# Altium PCB PCB_esp32_2026-10-11.pcbdoc
Units mil, origin at the board's own origin, x right, y up, seen from the top; angles counter-clockwise.
Board outline 4238.34 x 4241.91 mil, 2 copper layers (Top Layer, Bottom Layer); 60 components, 78 nets, 270 pads, 168 vias.
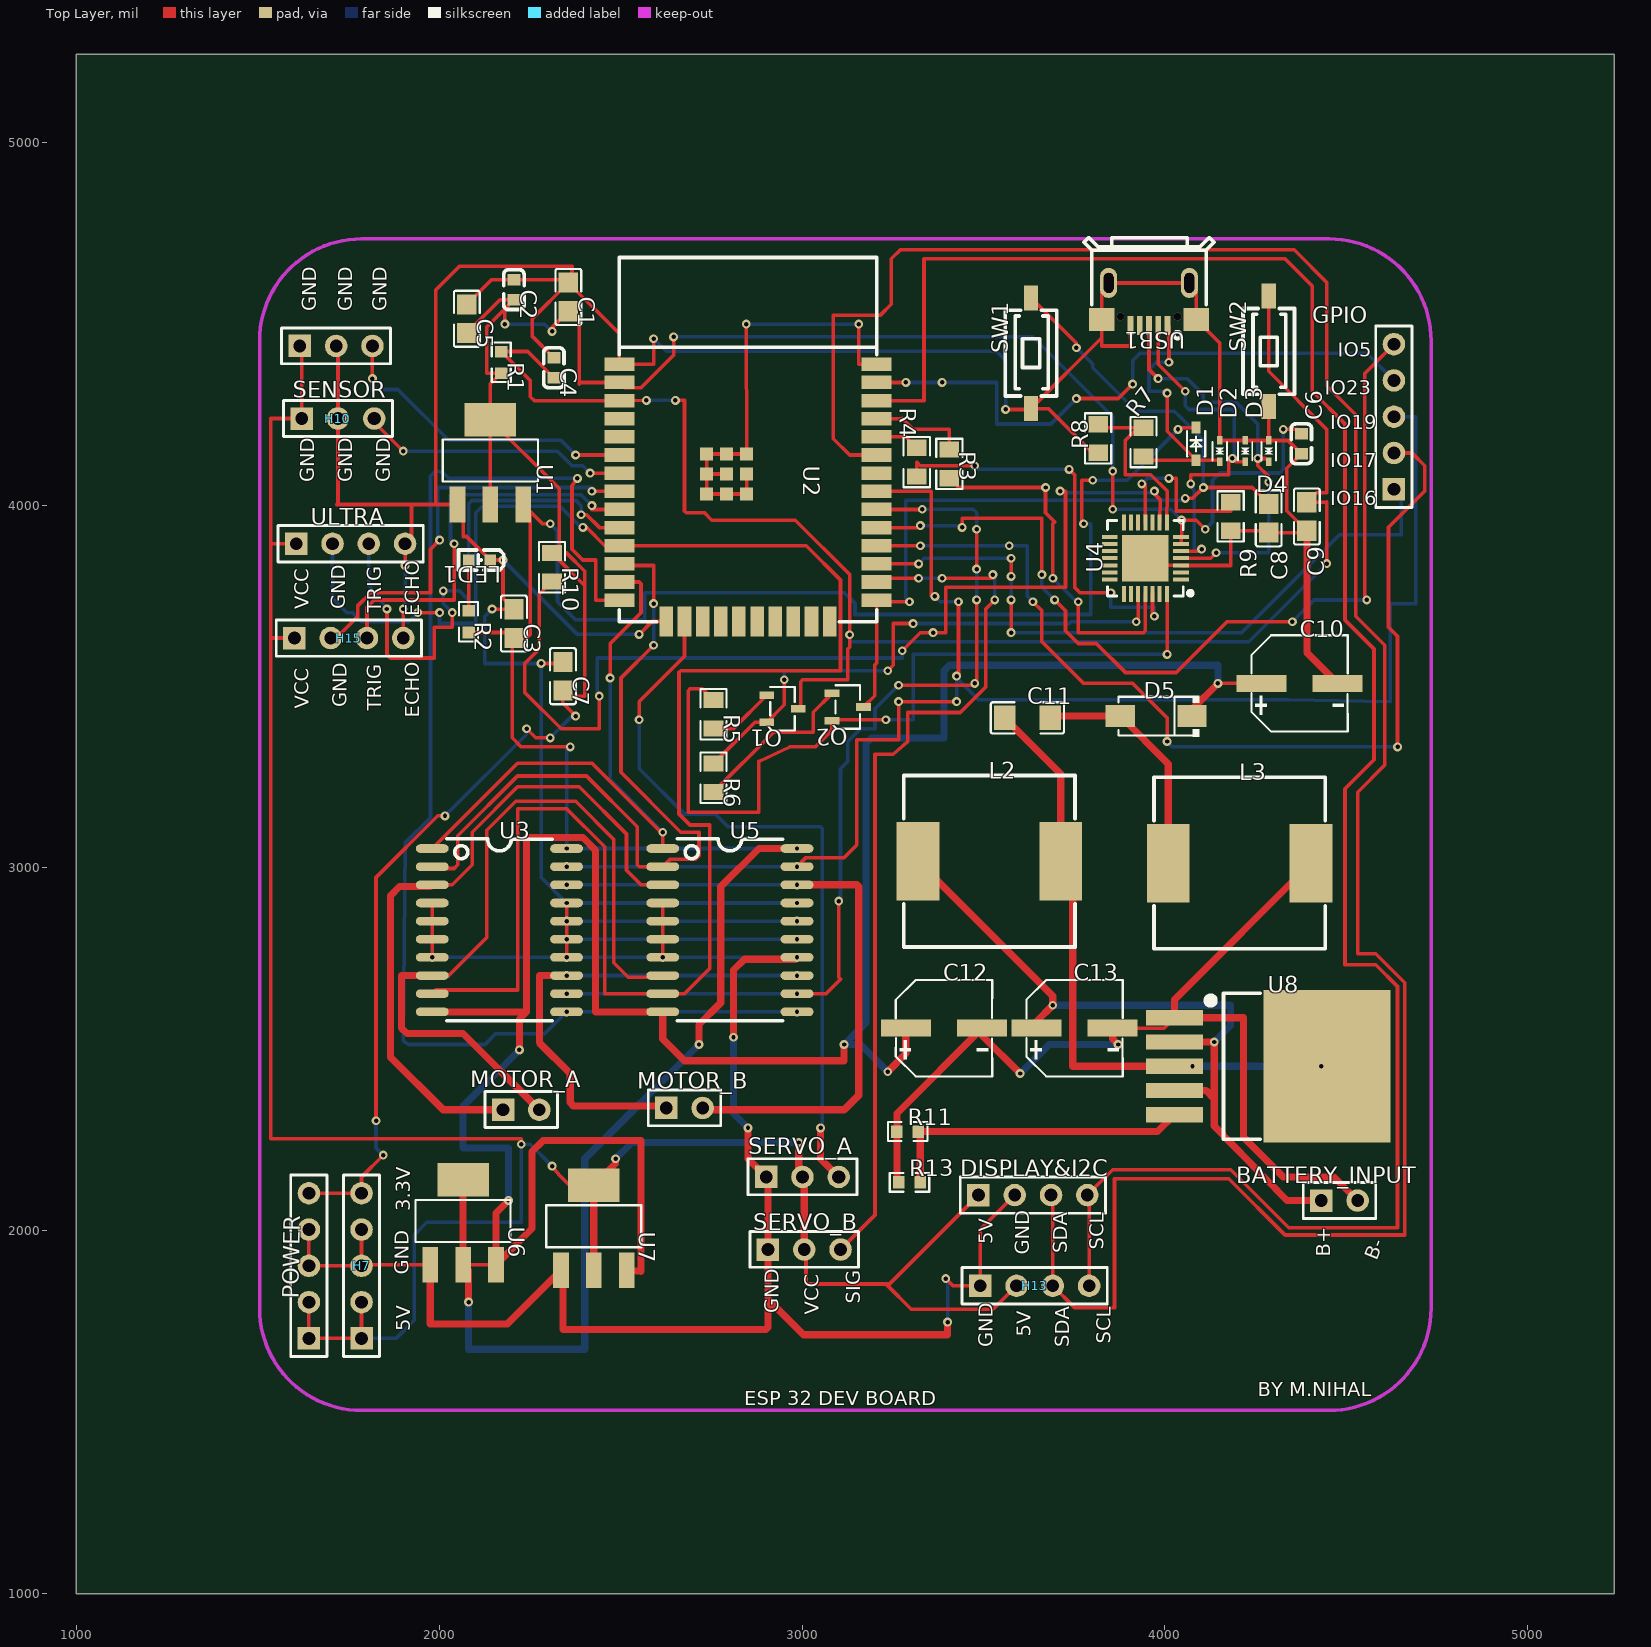
[diagram p0: Top Layer view]
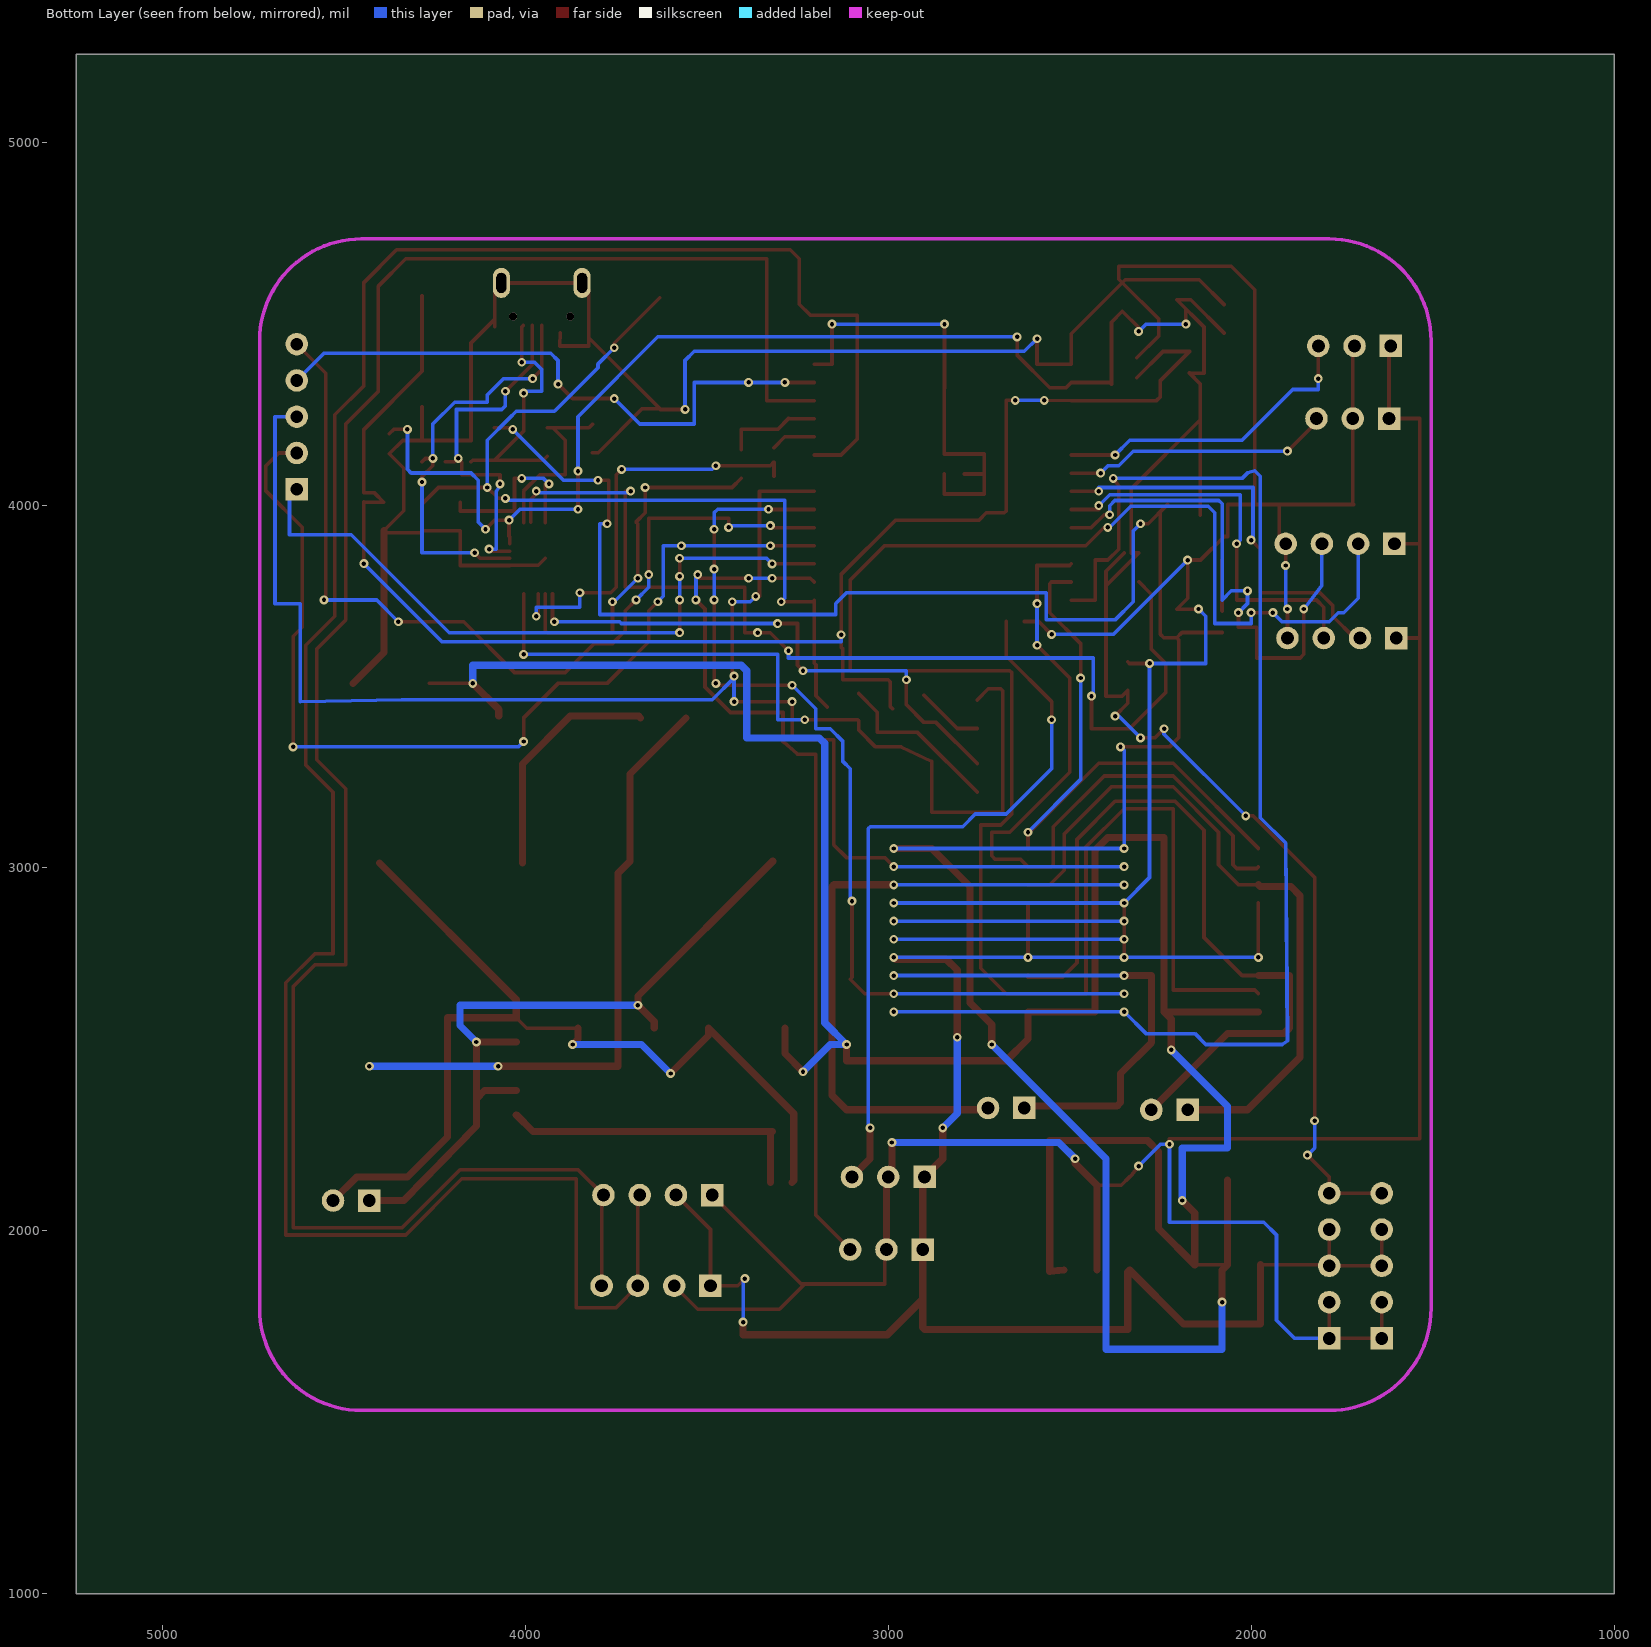
[diagram p1: Bottom Layer view, seen from below]

## Layer stack, top to bottom
Top Layer: signal copper (thickness not stored)
Dielectric: dielectric 12.6, FR-4, Dk 4.8
Bottom Layer: signal copper (thickness not stored)

## Board outline
5238.34,1000 1000,1000 1000,5241.91 5238.34,5241.91

## Components (designator, comment, footprint, x,y, rotation, side; value= is the part's Value field where it differs from the comment)
BATTERY_INPUT "HDR-F-2.54_1x2" HDR-F-2.54_1X2 4480.9,2083.35 r0 top
C1 "22uF" C0805 2355.9,4573.35 r270 top
C2 "100nF" C0603 2205.9,4593.35 r270 top
C3 "22uF" C0805 2205.9,3673.35 r270 top
C4 "100nF" C0603 2315.9,4378.35 r270 top
C5 "22uF" C0805 2075.9,4513.35 r270 top
C6 "4.7uF" C0603 4375.9,4168.73 r90 top
C7 "100nF" C0805 2340.9,3528.35 r270 top
C8 "100nF" C0805 4285.9,3963.35 r90 top
C9 "100nF" C0805 4390.9,3968.35 r90 top
C10 "100uF" CAP-SMD_BD6.3-L6.6-W6.6-FD 4370.9,3508.35 r0 top
C11 "10uF" C1206 3620.9,3413.35 r0 top
C12 "220uF" CAP-SMD_BD6.3-L6.6-W6.6-LS7.4-FD 3390.9,2558.35 r0 top
C13 "220uF" CAP-SMD_BD6.3-L6.6-W6.6-LS7.4-FD 3750.9,2558.35 r0 top
D1 "BAT760-7_C27636120" SOD-323_L1.7-W1.3-LS2.6-FD-1 4085.9,4168.35 r90 top
D2 "LESD5D5.0CT1G" SOD-523_L1.2-W0.8-LS1.6-BI 4150.9,4148.35 r90 top
D3 "LESD5D5.0CT1G" SOD-523_L1.2-W0.8-LS1.6-BI 4220.9,4148.35 r90 top
D4 "LESD5D5.0CT1G" SOD-523_L1.2-W0.8-LS1.6-BI 4285.9,4148.35 r90 top
D5 "SS54_C22452" SMA_L4.4-W2.8-LS5.4-R-RD 3975.9,3418.35 r180 top
DISPLAY&I2C "HDR-F-2.54_1x4" HDR-F-2.54_1X4 3635.9,2098.35 r0 top
GPIO "HDR-F-2.54_1x5" HDR-F-2.54_1X5 4630.9,4243.35 r90 top
H7 "HDR-F-2.54_1x5" HDR-F-2.54_1X5 1785.9,1903.35 r90 top
H10 "HDR-F-2.54_1x3" HDR-F-2.54_1X3 1720.9,4238.35 r0 top
H13 "HDR-F-2.54_1x4" HDR-F-2.54_1X4 3640.9,1848.35 r0 top
H15 "HDR-F-2.54_1x4" HDR-F-2.54_1X4 1750.9,3633.35 r0 top
L2 "33uH" IND-SMD_L12.0-W12.0_CDRH127NP 3515.9,3018.35 r0 top
L3 "33uH" IND-SMD_L12.0-W12.0_CDRH127NP 4205.9,3013.35 r0 top
LED1 "KT-0603R" LED-SMD_L1.6-W0.8-R-RD 2110.9,3848.35 r180 top
MOTOR_A "HDR-F-2.54_1x2" HDR-F-2.54_1X2 2225.9,2333.35 r0 top
MOTOR_B "HDR-F-2.54_1x2" HDR-F-2.54_1X2 2675.9,2338.35 r0 top
POWER "HDR-F-2.54_1x5" HDR-F-2.54_1X5 1640.9,1903.35 r90 top
Q1 "S8050_C2146" SOT-23-3_L3.0-W1.7-P0.95-LS2.9-BR 2945.9,3438.35 r180 top
Q2 "S8050_C2146" SOT-23-3_L3.0-W1.7-P0.95-LS2.9-BR 3125.9,3443.35 r180 top
R1 "10k" R0603 2170.9,4393.35 r270 top
R2 "2K" R0603 2080.9,3678.35 r270 top
R3 "0Ω" R0805 3405.9,4113.35 r270 top
R4 "0Ω" R0805 3315.9,4118.35 r270 top
R5 "10kΩ" R0805 2755.9,3423.35 r270 top
R6 "10kΩ" R0805 2755.9,3248.35 r270 top
R7 "20.5kΩ" R0805 3940.9,4173.35 r90 top
R8 "47kΩ" R0805 3815.9,4183.35 r90 top
R9 "10kΩ" R0805 4180.9,3968.35 r90 top
R10 "2K" R0805 2310.9,3828.35 r270 top
R11 "2kΩ" R0603 3290.9,2273.35 r0 top
R13 "18kΩ" R0603 3295.9,2133.35 r0 top
SENSOR "HDR-F-2.54_1x3" HDR-F-2.54_1X3 1715.9,4438.35 r0 top
SERVO_A "HDR-F-2.54_1x3" HDR-F-2.54_1X3 3000.9,2148.35 r0 top
SERVO_B "HDR-F-2.54_1x3" HDR-F-2.54_1X3 3005.9,1948.35 r0 top
SW1 "HX-3X6X2.5-X SMD TACT SWITCH" SW-SMD_HX-3X6X2.5-X 3630.9,4418.35 r90 top
SW2 "HX-3X6X2.5-X SMD TACT SWITCH" SW-SMD_HX-3X6X2.5-X 4285.9,4423.35 r90 top
U1 "AMS1117-3.3" SOT-223-3_L6.5-W3.4-P2.30-LS7.0-BR 2140.9,4118.35 r270 top
U2 "ESP32-WROOM-32E(4MB)" WIFI-SMD_ESP32-WROOM-32E 2850.9,4033.35 r270 top
U3 "L293DD" SOIC-20_L12.8-W7.5-P1.27-LS10.3-TL 2165.9,2828.35 r0 top
U4 "CP2102N-A01-GQFN28" QFN-28_L5.0-W5.0-P0.50-BL-EP3.3 3945.9,3853.35 r90 top
U5 "L293DD" SOIC-20_L12.8-W7.5-P1.27-LS10.3-TL 2800.9,2828.35 r0 top
U6 "AMS1117-5.0RG" SOT-223-3_L6.4-W3.5-P2.30-LS7.0-BR 2065.9,2023.35 r270 top
U7 "AMS1117-5.0RG" SOT-223-3_L6.4-W3.5-P2.30-LS7.0-BR 2425.9,2008.35 r270 top
U8 "XL6019E1" TO-263-5_L10.2-W9.9-P1.70-LS14.4-TL 4235.9,2453.35 r0 top
ULTRA "HDR-F-2.54_1x4" HDR-F-2.54_1X4 1755.9,3893.35 r0 top
USB1 "U254-051T-4BH83-S1S" MICRO-USB-SMD_U254-051T-4BH83-S1S 3955.9,4553.35 r180 top

## Footprints (in the part's own frame and the unit in brackets; to place one, negate y for a bottom-side part, rotate by r counter-clockwise, add the part's x,y. Pads: shape width x height; smd on the part's side, far side on the other; paste and mask are expansions set on the pad)
C0603 [mm]
  rect 0.8x0.9 smd paste+0 mask+0.051: 1(-0.7,0) 2(0.7,0)
  silkscreen extent -1.39,-0.71 1.39,0.71
C0805 [mm]
  rect 1.41x1.35 smd paste-100 mask+0.051: 1(-1,0) 2(1,0)
  silkscreen extent -1.96,-0.9 1.96,0.9
C1206 [mm]
  rect 1.485x1.728 smd paste-100 mask+0.051: 1(-1.593,0) 2(1.593,0)
  silkscreen extent -2.56,-1.09 2.56,1.09
CAP-SMD_BD6.3-L6.6-W6.6-FD [mm]
  rect 3.5x1.2 smd paste+0 mask+0.051: 1(-2.67,0) 2(2.67,0)
  silkscreen extent -3.38,-3.38 3.38,3.38
CAP-SMD_BD6.3-L6.6-W6.6-LS7.4-FD [mm]
  rect 3.5x1.2 smd paste+0 mask+0.051: 1(-2.67,0) 2(2.67,0)
  silkscreen extent -3.38,-3.38 3.38,3.38
HDR-F-2.54_1X2 [mil]
  rect 62x62 hole 35 paste+0 mask+2: 1(-50,0)
  round 62 hole 35 paste+0 mask+2: 2(50,0)
  silkscreen extent -100,-49 100,50
HDR-F-2.54_1X3 [mil]
  rect 62x62 hole 35 paste+0 mask+2: 1(-100,0)
  round 62 hole 35 paste+0 mask+2: 2(0,0)
  round 62 hole 36 paste+0 mask+2: 3(100,0)
  silkscreen extent -150,-49 150,50
HDR-F-2.54_1X4 [mil]
  rect 62x62 hole 35 paste+0 mask+2: 1(-150,0)
  round 62 hole 35 paste+0 mask+2: 2(-50,0) 3(50,0) 4(150,0)
  silkscreen extent -200,-50 200,50
HDR-F-2.54_1X5 [mil]
  rect 62x62 hole 35 paste+0 mask+2: 1(-200,0)
  round 62 hole 35 paste+0 mask+2: 2(-100,0) 3(0,0) 4(100,0) 5(200,0)
  silkscreen extent -250,-50 250,50
IND-SMD_L12.0-W12.0_CDRH127NP [mm]
  rect 3x5.5 smd paste+0 mask+0.051: 1(-5,0) 2(5,0)
  silkscreen extent -6,-6 6,6
LED-SMD_L1.6-W0.8-R-RD [mm]
  rect 0.8x0.8 smd paste+0 mask+0.051: 1(0.75,0) 2(-0.75,0)
  silkscreen extent -1.7,-0.7 1.47,0.7
MICRO-USB-SMD_U254-051T-4BH83-S1S [mm]
  rect 0.4x1.35 smd paste-100 mask+0.05: 1(-1.3,1.488) 2(-0.65,1.488) 3(0,1.488) 4(0.65,1.488) 5(1.3,1.488)
  rect 1.8x1.6 smd paste-100 mask+0.05: 6(-3.3,1.063) 6(3.3,1.063)
  oval 1.2x2.1 hole 0.7 slot 1.4 at 90 deg paste+0 mask+0.05: 6(-2.825,-1.487) 6(2.825,-1.487)
  round 0.55 hole 0.55 unplated paste+0: ""(-2,0.863) ""(2,0.863)
  silkscreen extent -4.55,-4.66 4.55,2.4
QFN-28_L5.0-W5.0-P0.50-BL-EP3.3 [mm]
  rect 0.28x1.1 smd paste-100 mask+0.051: 1(-1.501,-2.5) 2(-1.001,-2.5) 3(-0.501,-2.5) 4(0,-2.5) 5(0.5,-2.5) 6(1.001,-2.5) 7(1.501,-2.5) 15(1.501,2.5) 16(1.001,2.5) 17(0.5,2.5) 18(0,2.5) 19(-0.501,2.5) 20(-1.001,2.5) 21(-1.501,2.5)
  rect 1.1x0.28 smd paste-100 mask+0.051: 8(2.5,-1.501) 9(2.5,-1.001) 10(2.5,-0.501) 11(2.5,0) 12(2.5,0.5) 13(2.5,1.001) 14(2.5,1.501) 22(-2.5,1.501) 23(-2.5,1.001) 24(-2.5,0.5) 25(-2.5,0) 26(-2.5,-0.501) 27(-2.5,-1.001) 28(-2.5,-1.501)
  rect 3.25x3.25 smd paste-100 mask+0.051: 29(0,0)
  silkscreen extent -2.65,-3.3 2.65,2.65
R0603 [mil]
  rect 31.75x34.02 smd paste-3937.01 mask+2: 1(-29.66,0) 2(29.65,0)
  silkscreen extent -55,-26 55,26
R0805 [mil]
  rect 44.59x54.21 smd paste-3937.01 mask+2: 1(-39.37,0) 2(39.37,0)
  silkscreen extent -69,-36 69,36
SMA_L4.4-W2.8-LS5.4-R-RD [mil]
  rect 81.2x60.59 smd paste+0 mask+2: 1(98.57,0) 2(-98.57,0)
  silkscreen extent -119,-56 104,56
SOD-323_L1.7-W1.3-LS2.6-FD-1 [mm]
  rect 0.83x0.63 smd paste+0 mask+0.05: 1(-1.14,0) 2(1.14,0)
  silkscreen extent -0.89,-0.63 0.89,0.64
SOD-523_L1.2-W0.8-LS1.6-BI [mm]
  rect 0.6x0.4 smd paste+0 mask+0.051: 1(-0.75,0) 2(0.75,0)
  silkscreen extent -0.65,-0.5 0.65,0.5
SOIC-20_L12.8-W7.5-P1.27-LS10.3-TL [mm]
  oval 2.3x0.6 smd paste+0 mask+0.051: 1(-4.7,5.715) 2(-4.7,4.445) 3(-4.7,3.175) 4(-4.7,1.905) 5(-4.7,0.635) 6(-4.7,-0.635) 7(-4.7,-1.905) 8(-4.7,-3.175) 9(-4.7,-4.445) 10(-4.7,-5.715) 11(4.7,-5.715) 12(4.7,-4.445) 13(4.7,-3.175) 14(4.7,-1.905) 15(4.7,-0.635) 16(4.7,0.635) 17(4.7,1.905) 18(4.7,3.175) 19(4.7,4.445) 20(4.7,5.715)
  silkscreen extent -3.68,-6.35 3.68,6.39
SOT-23-3_L3.0-W1.7-P0.95-LS2.9-BR [mm]
  rect 1.037x0.532 smd paste+0 mask+0.051: 1(1.101,-0.95) 2(1.101,0.95) 3(-1.101,0)
  silkscreen extent -0.86,-1.53 0.86,1.53
SOT-223-3_L6.4-W3.5-P2.30-LS7.0-BR [mm]
  rect 2.5x1.1 smd paste+0 mask+0.051: 1(2.97,-2.3) 2(2.97,0) 3(2.97,2.3)
  rect 2.34x3.6 smd paste+0 mask+0.051: 4(-2.97,0)
  silkscreen extent -1.57,-3.33 1.37,3.33
SOT-223-3_L6.5-W3.4-P2.30-LS7.0-BR [mm]
  rect 2.5x1.1 smd paste+0 mask+0.051: 1(2.97,-2.3) 2(2.97,0) 3(2.97,2.3)
  rect 2.34x3.6 smd paste+0 mask+0.051: 4(-2.97,0)
  silkscreen extent -1.57,-3.33 1.37,3.33
SW-SMD_HX-3X6X2.5-X [mm]
  rect 1.75x1 smd paste+0 mask+0.051: 1(-3.875,0) 2(3.875,0)
  silkscreen extent -3,-1.8 3,1.8
TO-263-5_L10.2-W9.9-P1.70-LS14.4-TL [mm]
  rect 4x1.069 smd paste+0 mask+0.051: 1(-5.334,3.4) 2(-5.334,1.7) 3(-5.334,0) 4(-5.334,-1.7) 5(-5.334,-3.4)
  rect 8.89x10.66 smd paste+0 mask+0.051: 6(5.334,0)
  silkscreen extent -3.05,-5.1 0.66,5.1
WIFI-SMD_ESP32-WROOM-32E [mm]
  rect 0.95x2.1 smd paste+0 mask+0.051: 1(-9.002,-9) 2(-7.732,-9) 3(-6.462,-9) 4(-5.192,-9) 5(-3.922,-9) 6(-2.652,-9) 7(-1.382,-9) 8(-0.112,-9) 9(1.158,-9) 10(2.428,-9) 11(3.698,-9) 12(4.968,-9) 13(6.238,-9) 14(7.508,-9) 25(7.507,9) 26(6.237,9) 27(4.967,9) 28(3.697,9) 29(2.427,9) 30(1.157,9) 31(-0.113,9) 32(-1.383,9) 33(-2.653,9) 34(-3.923,9) 35(-5.193,9) 36(-6.463,9) 37(-7.733,9) 38(-9.003,9)
  rect 2.1x0.95 smd paste+0 mask+0.051: 15(9.002,-5.715) 16(9.002,-4.445) 17(9.002,-3.175) 18(9.002,-1.905) 19(9.002,-0.635) 20(9.002,0.635) 21(9.002,1.905) 22(9.002,3.175) 23(9.002,4.445) 24(9.002,5.715)
  rect 0.9x0.9 smd paste+0 mask+0.051: 39(-2.721,-0.1) 39(-2.721,-2.9) 39(-2.721,-1.5) 39(-1.322,-0.1) 39(-1.322,-2.9) 39(-1.321,-1.5) 39(0.079,-0.1) 39(0.079,-1.5) 39(0.079,-2.9)
  silkscreen extent -16.48,-9 9.02,9.02

## Via types
v1: diameter 24.41, hole 12.2, Top Layer to Bottom Layer, tented both sides, 168 vias

## Nets (pads, with @x,y where several pads share a name; then routed paths per layer and width w, separated by ;. In a path a pad name is that pad's centre, name@x,y a point inside that pad or via, vN(x,y) a via of type N, cw(c..) or ccw(c..) an arc to the next point about the centre after c; other vN are vias at no path point)
B+: BATTERY_INPUT.1 C13.1 L2.1 U8.2 U8.4 | length 2085.1
  Top Layer w19.68: L2.1 3690.78,2646.62 v1(3690.78,2621.36) 3645.78,2576.35 C13.1 ; U8.4 4113.5,2386.43 4135.9,2364.03 ; U8.2 v1(4135.9,2520.27) 4135.9,2364.03 ; BATTERY_INPUT.1 4335.9,2083.35 4135.9,2288.35 4135.9,2364.03
  Bottom Layer w19.68: v1(3690.78,2621.36) 4180.9,2621.35 4180.9,2565.27 v1(4135.9,2520.27)
B-: BATTERY_INPUT.2 C12.2 C13.2 L3.2 R11.1 R13.1 U8.1 | length 2717.5
  Top Layer w10: C13.2 3997.06,2558.35 U8.1
  Top Layer w19.68: R13.1 3261.24,2138.35 R11.1 3261.24,2323.57 C12.2 3496.02,2538.23 v1(3600.9,2433.35) ; C13.2 3856.02,2528.23 v1(3870.9,2513.35) ; L3.2 4025.9,2636.5 U8.1 4215.9,2587.19 4215.9,2258.35 4325.9,2148.35 4465.9,2148.35 BATTERY_INPUT.2
  Bottom Layer w19.68: v1(3600.9,2433.35) 3680.9,2513.35 v1(3870.9,2513.35)
CST: U4.23
DCD: U4.1
DSR: U4.27
DTR: Q2.2 R5.1 U4.28 | length 2281.9
  Top Layer w10: R5.1 2725.3,3493.35 2690.9,3493.35 2685.9,3488.35 2685.9,3153.35 2880.9,3153.35 2880.9,3293.35 2965.9,3333.35 3035.9,3333.35 3082.5,3379.95 Q2.2 ; Q2.2 3084.94,3408.35 v1(3230.9,3408.35) ; U4.28 4005.9,3754.03 v1(4005.9,3588.35)
  Bottom Layer w10: v1(3230.9,3408.35) 3305.9,3408.35 3305.9,3588.35 v1(4005.9,3588.35)
EN: C4.2 C9.2 Q1.3 R1.1 SW2.2 U2.3 | length 4699
  Top Layer w10: C4.2 2243.68,4423.01 R1.1 2250.9,4343.01 ; U2.3@2496.6,4287.75 v1(2570.9,4288.35) ; v1(2650.9,4288.35) 2675.9,4288.35 2675.9,3983.35 2680.9,3978.35 2730.9,3978.35 2750.9,3958.35 2980.9,3958.35 3130.9,3808.35 v1(3130.9,3642.6) 3130.9,3608.35 3125.9,3603.35 3125.9,3518.35 3000.9,3518.35 2995.9,3513.35 2995.9,3444.99 Q1.3 ; SW2.2 4285.9,4368.35 4445.9,4208.35 4445.9,4033.35 4416.5,4033.35 C9.2 4445.9,4008.35 v1(4445.9,3838.35) ; 2250.9,4298.35 2250.9,4343.01 ; 2250.9,4298.35 2261.47,4287.78 ; 2250.9,4298.35 2250.9,4343.01 ; 2261.47,4287.78 U2.3 2261.47,4287.78
  Bottom Layer w10: v1(2570.9,4288.35) v1(2650.9,4288.35) ; v1(3130.9,3642.6) 3130.9,3623.35 4230.9,3623.35 v1(4445.9,3838.35)
EXT_5V: C3.2 C10.1 C12.1 D1.2 D5.2 R2.2 U1.3 U3.10 U3.20 U5.10 U5.20 U6.2 U6.3 U6.4 U7.3 | length 13973.3
  Top Layer w10: U6.2 U6.3 ; R2.2 2191.19,3648.69 C3.2 2200.9,3628.98 2200.9,3358.35 2225.9,3333.35 v1(2360.9,3333.35) ; C3.2@2205.9,3633.95 2241.5,3633.95 2250.9,3643.35 2250.9,3981.95 U1.3 ; U1.3 2284.53,3948.35 v1(2305.9,3948.35) ; v1(3775.9,3948.35) 3770.9,3953.35 3770.9,4068.35 v1(3800.9,4068.35) ; v1(4035.9,4208.35) 4040.78,4213.23 D1.2 ; v1(4145.9,3508.35) C10.1
  Top Layer w19.68: U3.10 2240.9,2603.35 ; U6.4 U6.2 2080.9,1891.41 v1(2080.9,1803.35) ; U6.3 2156.45,2048.9 v1(2190.9,2083.35) ; U6.3@2156.5,1906.45 2255.9,2005.85 2255.9,2218.35 2285.9,2248.35 2555.9,2248.35 2555.9,1888.35 U7.3 ; v1(2220.9,2498.35) 2220.9,2583.35 2240.9,2603.35 ; U5.10 2430.9,2603.35 2430.9,3048.35 2395.9,3083.35 2240.9,3083.35 2240.9,3078.35 2240.9,2603.35 ; U5.10 2615.9,2528.35 2675.9,2468.35 3115.9,2468.35 v1(3115.9,2513.35) ; v1(2715.9,2513.35) 2715.9,2568.35 2775.9,2628.35 2775.9,2948.35 2880.9,3053.35 v1(2985.94,3053.35) ; v1(3235.9,2438.35) 3285.78,2488.23 C12.1 ; D5.2 4074.47,3436.92 v1(4145.9,3508.35)
  Bottom Layer w10: v1(2305.9,3948.35) 2325.9,3928.35 2325.9,3733.35 2375.9,3683.35 2565.9,3683.35 2565.9,3758.35 3115.9,3758.35 3145.9,3728.35 3145.9,3698.35 3795.9,3698.35 3795.9,3948.35 v1(3775.9,3948.35) ; v1(2360.9,3333.35) 2350.94,3323.39 v1(2350.94,3053.35) v1(2985.94,3053.35) ; v1(3800.9,4068.35) 3895.9,4068.35 v1(4035.9,4208.35) ; v1(4035.9,4208.35) 4036.21,4208.66 v1(4035.9,4208.35)
  Bottom Layer w19.68: v1(2080.9,1803.35) 2080.9,1673.35 2400.9,1673.35 2400.9,2198.35 v1(2715.9,2513.35) ; v1(2190.9,2083.35) 2190.9,2228.35 2065.9,2228.35 2065.9,2283.35 2065.9,2343.35 v1(2220.9,2498.35) ; v1(3235.9,2438.35) 3160.9,2513.35 v1(3115.9,2513.35) 3175.9,2573.35 3175.9,3343.35 3190.9,3358.35 3390.9,3358.35 3390.9,3543.35 3405.9,3558.35 4145.9,3558.35 v1(4145.9,3508.35)
GND: C1.1 C2.1 C3.1 C4.1 C5.1 C6.1 C7.1 C8.1 C9.1 C10.2 D2.2 D3.2 D4.2 DISPLAY&I2C.2 H7.3 H7.4 H10.2 H13.1 H15.4 LED1.2 POWER.3 POWER.4 R8.1 R9.1 SENSOR.2 SERVO_A.1 SERVO_B.1 SW1.1 SW2.1 U1.1 U2.1 U2.15 U3.4 U3.5 U3.6 U3.7 U3.14 U3.15 U3.16 U3.17 U4.3 U4.29 U5.4 U5.5 U5.6 U5.7 U5.14 U5.15 U5.16 U5.17 U6.1 U7.1 ULTRA.4 USB1.5 USB1.6 | length 17458.7
  Top Layer w10: POWER.4@1615.9,2003.35 1640.9,1978.35 POWER.3 H7.3 ; SENSOR.2 1720.9,4433.35 H10.2 1720.9,4004.49 1717.83,4001.42 U1.1 2018.98,4001.43 1990.9,4003.35 1990.9,4593.35 2055.9,4658.35 2355.49,4658.35 2365.9,4658.35 2365.49,4622.31 C1.1 ; H7.4@1785.9,2008.35 H7.3 ; H15.4 v1(1900.9,3713.35) ; v1(1905.9,3833.35) ULTRA.4 1923.49,3910.94 1923.49,4001.42 ; U6.1 1788.97,1906.42 H7.3 ; v1(1980.86,2753.35) U3.6 U3.5 U3.4 ; U1.1@2050.4,4001.45 2065.9,4001.45 2065.9,3913.35 2075.43,3913.35 LED1.2 v1(2175.9,3848.35) 2175.9,3742.72 C3.1 v1(2145.9,3713.35) ; C5.1 2144.09,4620.91 C2.1 2347.71,4620.91 C1.1 ; v1(2280.9,3563.35) 2336.53,3563.35 C7.1 ; C4.1 2255.9,4465.91 2255.9,4512.72 C1.1 ; v1(2350.94,2753.35) v1(2350.94,2803.35) v1(2350.94,2853.35) v1(2350.94,2903.35) ; U2.1 2496.56,4472.06 C1.1 ; U2.1@2496.6,4387.75 2590.9,4388.35 v1(2590.9,4458.35) ; v1(2550.9,3643.35) 2586.47,3678.92 U2.15 ; v1(2615.86,2753.35) U5.6 U5.5 U5.4 ; v1(3395.9,1868.35) 3415.9,1848.35 H13.1 3490.9,2003.35 DISPLAY&I2C.2 ; v1(3560.9,4263.35) 3628.46,4263.35 SW1.1 3825.98,4460.87 3825.98,4511.51 3825.98,4438.35 3905.9,4438.35 USB1.5@3904.7,4474.75 ; SW1.1@3630.9,4265.75 3678.5,4265.75 3800.3,4143.95 R8.1@3815.9,4143.95 ; 3825.9,4456.35 3825.9,4528.35 3825.9,4548.35 3825.9,4593.13 USB1.6@3844.68,4611.91 ; USB1.6@3844.67,4611.91 USB1.6@4067.12,4611.91 ; U4.29 3965.61,3833.64 U4.3 ; U4.3@4043.9,3833.35 4180.9,3833.35 4180.9,3928.35 R9.1 4280.9,3928.98 C8.1 4385.9,3923.98 C9.1 4335.9,3983.98 4335.9,4101.17 C6.1 4339.2,4177.87 D4.2 ; USB1.6@4067.13,4611.91 4085.82,4593.21 USB1.6@4085.82,4491.51 ; USB1.6@4085.83,4511.51 4150.9,4446.44 D2.2 D3.2 D4.2 SW2.1
  Top Layer w19.68: U6.1 1975.35,1743.35 2187.28,1743.35 U7.1 2340.9,1885.87 2340.9,1728.35 2365.9,1728.35 2900.9,1728.35 2905.9,1733.35 SERVO_B.1 2905.9,2143.35 SERVO_A.1 2850.9,2198.35 v1(2850.9,2283.35) ; v1(2810.9,2533.35) 2810.9,2718.35 2840.9,2748.35 2980.94,2748.35 v1(2985.94,2753.35) ; 2905.9,1811.25 3003.8,1713.35 3400.9,1713.35 v1@3400.9,1743.35 ; C9.1 4390.9,3593.47 C10.2
  Bottom Layer w10: v1(1900.9,3713.35) 1905.9,3718.35 v1(1905.9,3833.35) ; v1(1980.86,2753.35) v1(2350.94,2753.35) v1(2985.94,2753.35) ; v1(2145.9,3713.35) 2125.9,3693.35 2125.9,3563.35 v1(2280.9,3563.35) 2280.9,2973.39 v1(2350.94,2903.35) v1(2985.94,2903.35) ; v1(2175.9,3848.35) 2380.9,3643.35 ; v1(2350.94,2803.35) v1(2985.94,2803.35) ; v1(2350.94,2853.35) v1(2985.94,2853.35) ; v1(2590.9,4458.35) 2625.9,4423.35 3535.9,4423.35 3560.9,4398.35 v1(3560.9,4263.35) ; v1(3395.9,1868.35) 3400.9,1863.35 v1(3400.9,1748.35) ; 2380.9,3643.35 v1(2550.9,3643.35) 2380.9,3643.35
  Bottom Layer w19.68: v1(2810.9,2533.35) 2810.9,2323.35 v1(2850.9,2283.35)
GP_5V: DISPLAY&I2C.1 H7.1 H7.2 H10.1 H13.2 H15.1 POWER.1 POWER.2 SENSOR.1 SERVO_A.2 SERVO_B.2 U7.2 U7.4 ULTRA.1 | length 6890.4
  Top Layer w10: 1535.9,3633.35 H15.1 ; 1535.9,3893.35 ULTRA.1 ; POWER.2@1615.9,1803.35 1640.9,1778.35 POWER.1 H7.1 H7.2@1785.9,1808.35 ; SENSOR.1 1620.9,4433.35 H10.1 1535.9,4238.35 1535.9,2253.35 2225.9,2253.35 v1(2225.9,2238.35) ; v1(2310.9,2178.35) 2330.9,2153.35 2335.9,2148.35 2358.97,2125.28 U7.4 ; SERVO_B.2 3010.9,1943.35 3010.9,1853.35 3240.9,1853.35 DISPLAY&I2C.1 ; 3235.23,1853.35 3235.23,1849.02 3300.9,1783.35 3525.9,1783.35 H13.2
  Top Layer w19.68: U7.2 U7.4 2485.9,2185.27 v1(2485.9,2198.35) ; v1(2990.9,2243.35) 2990.9,2158.35 SERVO_A.2 3005.9,2143.35 SERVO_B.2
  Bottom Layer w10: H7.1 1880.9,1703.35 1930.9,1753.35 1930.9,1988.35 1965.9,2023.35 2225.9,2023.35 v1(2225.9,2238.35) 2250.9,2238.35 v1(2310.9,2178.35)
  Bottom Layer w19.68: v1(2485.9,2198.35) 2530.9,2243.35 v1(2990.9,2243.35)
IO0: C8.2 Q2.3 SW1.2 U2.25 | length 2503.2
  Top Layer w10: Q2.3 3200.23,3474.32 3200.23,3559.32 3205.23,3564.32 U2.25 3209.66,3733.35 v1(3295.9,3733.35) ; SW1.2 3755.9,4445.95 v1(3755.9,4433.35) ; v1(4055.9,4018.35) 4075.9,4018.35 v1(4105.9,4048.35) 4240.27,4048.35 C8.2
  Bottom Layer w10: v1(3295.9,3733.35) 3285.9,3743.35 3285.9,4013.35 4055.9,4013.35 v1(4055.9,4018.35) ; v1(3755.9,4433.35) 3800.9,4388.35 3800.9,4378.35 3920.9,4258.35 4025.9,4258.35 4045.94,4238.3 4105.9,4178.35 v1(4105.9,4048.35)
IO2: U2.24
IO4: SERVO_B.3 U2.26 | length 2489
  Top Layer w10: SERVO_B.3 3200.9,2043.35 3200.9,3313.35 3245.9,3313.35 3250.9,3313.35 3290.9,3348.35 3290.9,3428.35 3435.9,3428.35 3505.9,3498.35 3505.9,3713.35 v1(3530.9,3738.35) ; U2.26 3215.8,3798.35 v1(3320.9,3798.35) ; v1(3385.9,3798.35) 3525.9,3798.35 v1(3525.9,3808.35)
  Bottom Layer w10: v1(3320.9,3798.35) v1(3385.9,3798.35) ; v1(3525.9,3808.35) 3530.9,3803.35 v1(3530.9,3738.35)
IO5: GPIO.5 U2.29 | length 2525.6
  Top Layer w10: U2.29 3320.33,3937.78 v1(3325.9,3943.35) ; v1(3440.9,3938.35) 3440.9,3963.35 3660.9,3963.35 v1(3660.9,3808.35) ; v1(3695.9,3738.35) 3725.9,3708.35 3725.9,3653.35 3760.9,3618.35 3810.9,3618.35 3890.9,3538.35 4030.9,3538.35 4170.9,3678.35 v1(4350.9,3678.35) ; v1(4555.9,3738.35) 4550.9,3738.35 4550.9,4363.35 GPIO.5
  Bottom Layer w10: v1(3325.9,3943.35) 3435.9,3943.35 v1(3440.9,3938.35) ; v1(3660.9,3808.35) 3660.9,3773.35 v1(3695.9,3738.35) ; v1(4350.9,3678.35) 4410.9,3738.35 v1(4555.9,3738.35)
IO12: U2.14 U3.11 U5.11 | length 3581.8
  Top Layer w10: v1(2380.9,4073.35) 2365.9,4053.35 2365.9,3878.35 2395.9,3848.35 2430.9,3848.35 2430.9,3738.35 2435.3,3737.75 U2.14@2496.6,3737.75
  Bottom Layer w10: v1(2350.94,2603.35) 2290.9,2543.35 2155.9,2543.35 2125.9,2513.35 1915.9,2513.35 1900.9,2523.35 1905.9,3068.35 1975.9,3138.35 1975.9,4079.35 1990.9,4094.35 2010.9,4088.35 2025.9,4073.35 v1(2380.9,4073.35) ; v1(2350.94,2603.35) v1(2985.94,2603.35)
IO13: SERVO_A.3 U2.16 | length 2013.5
  Top Layer w10: v1(2550.9,3408.35) 2550.9,3458.35 2675.91,3583.36 U2.16
  Top Layer w19.68: v1(3050.9,2283.35) 3050.9,2198.35 SERVO_A.3
  Bottom Layer w10: v1(2550.9,3408.35) 2550.9,3273.35 2675.9,3148.35 2760.9,3148.35 2795.9,3113.35 3050.9,3113.35 3055.9,3108.35 3055.9,2288.35 v1(3050.9,2283.35)
IO14: U2.13 U3.1 U5.1 | length 1697.4
  Top Layer w10: U3.1 2215.9,3288.35 2420.9,3288.35 2610.9,3098.35 v1(2615.9,3098.35) U5.1 ; v1(2470.9,3523.35) 2470.9,3618.35 2555.9,3703.35 2555.9,3783.35 2551.5,3787.75 U2.13@2496.6,3787.75
  Bottom Layer w10: v1(2470.9,3523.35) 2470.9,3243.35 v1(2615.9,3098.35)
IO15: U2.23
IO16: GPIO.1 U2.27 | length 1914
  Top Layer w10: U2.27 v1(3320.9,3837.78) ; v1(3575.9,3648.35) v1(3575.9,3738.35) ; v1(3575.9,3803.35) v1(3575.9,3853.35)
  Bottom Layer w10: v1(3320.9,3837.78) 3336.47,3853.35 v1(3575.9,3853.35) ; v1(3575.9,3648.35) 4210.9,3648.35 4480.9,3918.35 4650.9,3918.35 4650.9,4043.35 GPIO.1 ; v1(3575.9,3738.35) v1(3575.9,3803.35)
IO17: GPIO.2 U2.28 | length 2761.1
  Top Layer w10: U2.28 v1(3325.9,3887.78) ; v1(3635.9,3733.35) 3660.9,3708.35 3660.9,3623.35 3775.9,3508.35 3910.9,3508.35 4005.9,3413.35 v1(4005.9,3348.35) ; GPIO.2 4680.9,4143.35 4715.9,4108.35 4715.9,4038.35 4615.9,3938.35 4615.9,3663.35 4640.9,3638.35 v1(4640.9,3333.35)
  Bottom Layer w10: v1(3325.9,3887.78) v1(3570.9,3887.78) 3620.9,3887.78 3620.9,3748.35 v1(3635.9,3733.35) ; v1(4005.9,3348.35) 4020.9,3333.35 v1(4640.9,3333.35)
IO18: U2.30 U3.12 U5.12 | length 2642.5
  Top Layer w10: v1(2985.94,2653.35) 3065.9,2653.35 3105.9,2693.35 3100.9,2698.35 v1(3100.9,2908.35) ; U2.30 3330.33,3987.78 v1(3330.9,3988.35) ; v1(3265.9,3503.35) 3475.9,3503.35 v1(3475.9,3508.35) 3480.9,3513.35 v1(3480.9,3738.35) ; v1(3480.9,3823.35) v1(3480.9,3933.35)
  Bottom Layer w10: v1(2350.94,2653.35) v1(2985.94,2653.35) ; v1(3100.9,2908.35) 3105.9,2913.35 3105.9,3273.35 3125.9,3293.35 3125.9,3348.35 3160.9,3383.35 3200.9,3383.35 3200.9,3438.35 v1(3265.9,3503.35) ; v1(3330.9,3988.35) 3470.9,3988.35 3480.9,3978.35 v1(3480.9,3933.35) ; v1(3480.9,3738.35) v1(3480.9,3823.35)
IO19: GPIO.3 U2.31 U3.19 U5.19 | length 4433.1
  Top Layer w10: v1(2985.94,3003.35) 3010.9,3028.35 3115.9,3028.35 3150.9,3063.35 3150.9,3353.35 3265.9,3353.35 v1(3265.9,3458.35) v1(3425.9,3458.35) ; U2.31@3205.2,4037.75 3355.9,4037.75 3355.9,3748.35 v1(3365.9,3748.35) ; v1(3425.9,3528.35) 3430.9,3533.35 v1(3430.9,3733.35)
  Bottom Layer w10: v1(2350.94,3003.35) v1(2985.94,3003.35) ; v1(3365.9,3748.35) 3380.9,3733.35 v1(3430.9,3733.35) ; v1(3425.9,3458.35) v1(3425.9,3528.35) 3425.9,3523.35 3485.9,3463.35 4340.9,3463.35 4620.9,3458.35 4620.9,3728.35 4690.9,3728.35 4690.9,4243.35 GPIO.3
IO21: DISPLAY&I2C.3 H13.3 U2.33 | length 6495.2
  Top Layer w10: U2.33@3205.2,4137.75 3130.9,4137.75 3085.9,4182.75 3085.9,4523.35 3215.9,4523.35 3245.9,4553.35 3245.9,4678.35 3270.9,4703.35 4355.9,4703.35 4445.9,4613.35 4445.9,4328.35 4525.9,4248.35 4525.9,3693.35 4605.9,3613.35 4605.9,3283.35 4530.9,3208.35 4530.9,2763.35 4580.9,2763.35 4660.9,2683.35 4660.9,1988.35 4330.9,1988.35 4175.9,2143.35 3860.9,2143.35 3860.9,1788.35 3750.9,1788.35 H13.3 3690.9,2093.35 DISPLAY&I2C.3
IO22: DISPLAY&I2C.4 H13.4 U2.36 | length 5633.1
  Top Layer w10: U2.36@3205.2,4287.75 3335.9,4287.75 3335.9,4678.35 4330.9,4678.35 4405.9,4603.35 4405.9,4313.35 4495.9,4223.35 4495.9,3683.35 4575.9,3603.35 4575.9,3298.35 4495.9,3218.35 4495.9,2733.35 4580.9,2733.35 4640.9,2673.35 4640.9,2008.35 4340.9,2008.35 4180.9,2168.35 3855.9,2168.35 DISPLAY&I2C.4 3790.9,2093.35 H13.4
IO23: GPIO.4 U2.37 | length 1690
  Top Layer w10: U2.37 v1(3285.9,4337.78) ; v1(3755.9,4293.35) 3870.9,4293.35 v1(3910.9,4333.35)
  Bottom Layer w10: v1(3285.9,4337.78) v1(3385.9,4337.78) 3535.9,4337.78 3535.9,4223.35 3685.9,4223.35 v1(3755.9,4293.35) ; v1(3910.9,4333.35) 3910.9,4398.35 3930.9,4418.35 4555.9,4418.35 GPIO.4
IO25: U2.10 ULTRA.3 | length 1511.8
  Top Layer w10: v1(1855.9,3713.35) 1855.9,3588.35 1865.9,3578.35 1960.9,3578.35 1985.9,3578.35 1985.9,3663.35 2035.9,3663.35 v1(2035.9,3703.35) ; v1(2390.9,3973.35) 2405.9,3973.35 2441.5,3937.75 U2.10@2496.6,3937.75
  Bottom Layer w10: ULTRA.3 1805.9,3778.35 v1(1855.9,3713.35) ; v1(2035.9,3703.35) 2010.9,3728.35 v1(2010.9,3763.35) 2055.9,3763.35 2080.9,3738.35 2080.9,4003.35 2089.9,4012.35 2376.9,4012.35 2390.9,3998.35 v1(2390.9,3973.35)
IO26: U2.11 U3.9 U5.9 ULTRA.2 | length 5339.9
  Top Layer w10: v1(1940.9,3703.35) v1(2000.9,3703.35) ; U3.9 1990.9,2663.35 2165.9,2663.35 2215.9,2663.35 2215.9,3163.35 2350.9,3163.35 2455.9,3058.35 2455.9,2653.35 U5.9 ; v1(2395.9,3938.35) 2405.9,3938.35 2456.47,3887.78 U2.11 ; U2.11@2496.6,3887.75 3011.5,3887.75 3105.9,3793.35 3105.9,3543.35 2665.9,3543.35 2660.9,3538.35 2660.9,3148.35 2690.9,3118.35 2745.9,3118.35 2745.9,2723.35 2675.9,2653.35 U5.9
  Bottom Layer w10: ULTRA.2 1705.9,3743.35 1745.9,3703.35 1760.9,3703.35 1785.9,3678.35 1915.9,3678.35 v1(1940.9,3703.35) ; v1(2000.9,3703.35) 2000.9,3673.35 2100.9,3673.35 2100.9,3978.35 2118.8,3996.25 2333,3996.25 2390.9,3938.35 v1(2395.9,3938.35)
IO27: U2.12 U3.2 U5.2 | length 2118.8
  Top Layer w10: U3.2 1985.9,2998.35 2040.9,2998.35 2050.9,3008.35 2050.9,3088.35 2215.9,3253.35 2405.9,3253.35 2545.9,3113.35 2545.9,3008.35 2550.9,3003.35 U5.2 2635.9,3023.35 2705.9,3023.35 2715.9,3033.35 2715.9,3098.35 2665.9,3098.35 2500.9,3263.35 2500.9,3523.35 v1(2590.9,3613.35) ; U2.12 2500.99,3833.35 2590.9,3833.35 v1(2590.9,3728.35)
  Bottom Layer w10: v1(2590.9,3613.35) v1(2590.9,3728.35)
IO32: H15.2 U2.8 | length 1158
  Top Layer w10: H15.2 1715.9,3633.35 1775.9,3693.35 1775.9,3723.35 1810.9,3758.35 1975.9,3758.35 1975.9,3878.35 v1(2000.9,3903.35) ; v1(2420.9,4037.78) U2.8
  Bottom Layer w10: v1(2000.9,3903.35) 1995.9,3908.35 1995.9,4048.35 2420.9,4048.35 v1@2420.9,4037.75
IO33: H15.3 U2.9 | length 1116.1
  Top Layer w10: H15.3 1800.9,3718.35 1820.9,3738.35 2040.9,3738.35 v1(2040.9,3893.35) ; v1(2420.9,3998.35) 2420.9,3987.78 U2.9
  Bottom Layer w10: v1(2040.9,3893.35) 2030.9,3903.35 2030.9,4028.35 2390.9,4028.35 v1(2420.9,3998.35)
IO34: SENSOR.3 U2.6 | length 875.5
  Top Layer w10: v1(1815.9,4348.35) SENSOR.3 ; v1(2375.9,4137.78) U2.6
  Bottom Layer w10: v1(1815.9,4348.35) 1815.9,4318.35 1885.9,4318.35 2025.9,4178.35 2335.3,4178.35 v1@2375.9,4137.75
IO35: H10.3 U2.7 | length 743.9
  Top Layer w10: H10.3 1820.9,4228.35 v1(1900.9,4148.35) ; v1(2415.9,4087.78) U2.7
  Bottom Layer w10: v1(1900.9,4148.35) 2325.9,4148.35 2365.9,4108.35 2395.33,4108.35 v1(2415.9,4087.78)
L3_1: C11.2 D5.1 L3.1 | length 655.4
  Top Layer w19.68: C11.2 3688.6,3418.35 D5.1 4009.05,3286.63 L3.1
MOTOR_A: MOTOR_A.1 U3.3 U5.3 | length 1912.4
  Top Layer w10: U3.3 2035.9,2953.35 2090.9,3008.35 2090.9,3098.35 2215.9,3223.35 2385.9,3223.35 2515.9,3093.35 2515.9,2993.35 2555.9,2953.35 U5.3
  Top Layer w19.68: U3.3 1975.86,2948.35 1890.9,2948.35 1865.9,2923.35 1865.9,2478.35 2010.9,2333.35 MOTOR_A.1
MOTOR_B: MOTOR_A.2 U3.8 U5.8 | length 2114.8
  Top Layer w10: U3.8 2025.9,2703.35 2130.9,2808.35 2130.9,3103.35 2210.9,3183.35 2375.9,3183.35 2480.9,3078.35 2480.9,2738.35 2520.9,2698.35 2615.9,2698.35 U5.8
  Top Layer w19.68: U3.8 1895.9,2703.35 1895.9,2693.35 1895.9,2558.35 1910.9,2543.35 2065.9,2543.35 MOTOR_A.2
MOTOR_C: MOTOR_B.1 U3.13 U5.13 | length 1366.5
  Top Layer w19.68: v1(2350.94,2703.35) 2275.9,2703.35 2275.9,2518.35 2360.9,2433.35 2360.9,2353.35 2370.9,2343.35 2620.9,2343.35 MOTOR_B.1
  Bottom Layer w10: v1(2350.94,2703.35) v1(2985.94,2703.35)
MOTOR_D: MOTOR_B.2 U3.18 U5.18 | length 1830.7
  Top Layer w19.68: MOTOR_B.2 2730.9,2333.35 3115.9,2333.35 3155.9,2373.35 3155.9,2948.35 3150.9,2953.35 v1(2985.94,2953.35)
  Bottom Layer w10: v1(2350.94,2953.35) v1(2985.94,2953.35)
NC: U2.32
R2_1: LED1.1 R2.1 | length 140.5
  Top Layer w10: R2.1 2081.37,3708.48 LED1.1
R5_2: Q1.1 R5.2 | length 184.7
  Top Layer w10: R5.2 2810.77,3383.98 Q1.1
R6_2: Q2.1 R6.2 | length 471.9
  Top Layer w10: R6.2 2920.27,3373.35 3030.9,3373.35 3030.9,3429.11 Q2.1
RI: U4.2
RTS: Q1.2 R6.1 U4.24 | length 1531.2
  Top Layer w10: R6.1 2869.13,3400.95 Q1.2 2950.9,3449.31 v1(2950.9,3518.35) ; v1(3235.9,3543.35) 3250.9,3558.35 3250.9,3673.35 v1(3305.9,3673.35) ; v1(3920.9,3678.35) 3926.2,3678.35 U4.24
  Bottom Layer w10: v1(2950.9,3518.35) 2950.9,3543.35 v1(3235.9,3543.35) ; v1(3305.9,3673.35) 3735.9,3673.35 3740.9,3678.35 3755.9,3678.35 v1(3920.9,3678.35)
RXD: R3.2 U4.25 | length 1008.6
  Top Layer w10: R3.2 3431.53,4048.35 v1(3670.9,4048.35) 3670.9,3978.35 3695.9,3953.35 3690.9,3948.35 v1(3690.9,3798.35) ; v1(3760.9,3733.35) 3760.9,3648.35 3850.9,3648.35 3940.9,3648.35 3945.9,3653.35 U4.25
  Bottom Layer w10: v1(3690.9,3798.35) 3755.9,3733.35 v1(3760.9,3733.35)
RXD0: R4.1 U2.34 | length 123.1
  Top Layer w10: U2.34 3285.84,4187.78 R4.1
SENSOR_VN: U2.5
SENSOR_VP: U2.4
TXD: R4.2 U4.26 | length 1157
  Top Layer w10: R4.2 3315.9,4118.35 3325.9,4108.35 v1(3475.9,4108.35) ; v1(3735.9,4098.35) 3750.9,4083.35 3750.9,3773.35 3765.9,3758.35 v1(3850.9,3758.35) ; U4.26 3965.6,3693.35 v1(3970.9,3693.35)
  Bottom Layer w10: v1(3475.9,4108.35) 3485.9,4098.35 v1(3735.9,4098.35) ; v1(3850.9,3758.35) 3850.9,3718.35 3970.9,3718.35 v1(3970.9,3693.35)
TXD0: R3.1 U2.35 | length 268.8
  Top Layer w10: U2.35@3205.2,4237.75 3275.8,4238.35 3305.8,4208.35 3405.9,4208.35 3405.9,4188.35 3405.9,4183.35 R3.1
U2_17: U2.17
U2_18: U2.18
U2_19: U2.19
U2_20: U2.20
U2_21: U2.21
U2_22: U2.22
U2_38: U2.38 U2.39 | length 1268.1
  Top Layer w10: U2.39@2736.72,4085.38 U2.39@2791.83,4085.38 ; v1(2845.9,4498.35) 2846.96,4140.5 2736.72,4140.5 2736.72,4030.26 2791.84,4030.26 2846.96,4030.26 U2.39@2846.96,4085.38 ; v1(3155.9,4498.35) 3155.9,4388.35 U2.38@3205.2,4387.75
  Bottom Layer w10: v1(2845.9,4498.35) v1(3155.9,4498.35)
U4_8: R7.2 R8.2 U4.8 | length 508.6
  Top Layer w10: R8.2 3825.9,4212.72 R7.2 3925.27,4212.72 3890.9,4178.35 3890.9,4083.35 3960.9,4083.35 4005.9,4038.35 U4.8@4005,3951.75
U4_9: R10.2 U4.9 | length 2871.5
  Top Layer w10: R10.2@2310.9,3788.95 2275.9,3753.95 2275.9,3603.35 2235.9,3563.35 2235.9,3483.35 2335.9,3383.35 2440.9,3383.35 v1(2440.9,3473.35) ; v1(3275.9,3598.35) 3325.9,3648.35 v1(3360.9,3648.35) 3395.9,3648.35 3395.9,3773.35 3725.9,3773.35 3725.9,4038.35 v1(3710.9,4038.35) ; v1(3970.9,4038.35) 3970.9,4030.52 3986.5,4014.92 U4.9@3985.9,3953.35
  Bottom Layer w10: v1(2440.9,3473.35) 2435.9,3478.35 2435.9,3578.35 3275.9,3578.35 v1(3275.9,3598.35) ; v1(3710.9,4038.35) 3715.9,4033.35 3965.9,4033.35 v1(3970.9,4038.35)
U4_10: U4.10
U4_11: R9.2 U4.11 | length 482.2
  Top Layer w10: v1(3935.9,4058.35) 3945.9,4058.35 U4.11@3945.9,3951.75 ; v1(4010.9,4073.35) 4030.9,4073.35 4030.9,3983.35 4180.9,3983.35 R9.2
  Bottom Layer w10: v1(3935.9,4058.35) 3950.9,4073.35 v1(4010.9,4073.35)
U4_12: U4.12
U4_13: U4.13
U4_14: U4.14
U4_15: U4.15
U4_16: U4.16
U4_17: U4.17
U4_18: U4.18
U4_19: U4.19
U4_20: U4.20
U4_21: U4.21
U4_22: U4.22
U8_3: C11.1 L2.2 U8.3 U8.6 | length 1772.7
  Top Layer w19.68: C11.1 3712.75,3258.8 L2.2 ; L2.2@3712.8,3018.35 3745.9,2985.25 3745.9,2453.35 v1(4075.9,2453.35) U8.3
  Bottom Layer w19.68: v1(4075.9,2453.35) v1(4430.9,2453.35)
U8_5: R11.2 R13.2 U8.5 | length 866.5
  Top Layer w19.68: R13.2 3325.56,2268.35 R11.2 3979.74,2273.35 U8.5
USB1_4: USB1.4
USB_DN: D3.1 U4.5 USB1.2 | length 1011.5
  Top Layer w10: USB1.2 3981.5,4387.76 v1(4055.9,4313.35) ; U4.5 4100.9,3873.05 v1(4100.9,3878.35) ; v1(4070.9,4058.35) 4070.9,4083.35 4165.9,4083.35 4175.9,4083.35 4175.9,4118.35 v1(4185.9,4128.35) 4195.42,4118.83 D3.1
  Bottom Layer w10: v1(4055.9,4313.35) 4055.9,4273.35 4065.9,4263.35 4190.9,4263.35 4190.9,4133.35 v1(4185.9,4128.35) ; v1(4070.9,4058.35) 4070.9,4053.35 4080.9,4038.35 4080.9,3878.35 v1(4100.9,3878.35)
USB_DP: D4.1 U4.4 USB1.3 | length 1144.5
  Top Layer w10: USB1.3 3955.91,4373.34 v1(3980.9,4348.35) ; U4.4 4125.9,3853.35 v1(4140.9,3868.35) ; v1(4285.9,4063.35) 4285.9,4078.35 4255.9,4108.35 v1(4255.9,4128.35) 4276.37,4128.35 D4.1
  Bottom Layer w10: v1(3980.9,4348.35) 4060.9,4348.35 4105.9,4303.35 4105.9,4283.35 4195.9,4283.35 4255.9,4223.35 v1(4255.9,4128.35) ; v1(4140.9,3868.35) 4285.9,3868.35 v1(4285.9,4063.35)
VBUS: D1.1 D2.1 R7.1 USB1.1 | length 712.7
  Top Layer w10: R7.1 3951.41,4123.47 D1.1 ; v1(4005.9,4308.35) 4005.9,4203.47 D1.1 ; USB1.1 4010.9,4490.97 v1(4010.9,4393.35) ; D2.1 4146.26,4123.47 D1.1
  Bottom Layer w10: v1(4005.9,4308.35) 4000.9,4313.35 3955.9,4313.35 3955.9,4373.35 3975.9,4393.35 v1(4010.9,4393.35)
VDD33: C1.2 C2.2 C5.2 C6.2 C7.2 H7.5 POWER.5 R1.2 R10.1 U1.2 U1.4 U2.2 U4.6 U4.7 | length 7561.9
  Top Layer w10: POWER.5 H7.5 1785.9,2148.35 v1(1845.9,2208.35) ; v1(1825.9,2303.35) 1825.9,2973.35 1995.9,3143.35 v1(2015.9,3143.35) ; C5.2 2167.71,4565.79 C2.2 2180.9,4540.79 v1(2180.9,4498.35) ; U1.2@2140.9,3971.43 U1.4 ; U1.4@2140.9,4235.25 2330.9,4045.25 2330.9,3867.75 R10.1 ; R1.2@2170.9,4363.65 2130.9,4363.35 2130.9,4490.75 C2.2@2205.9,4565.75 ; R1.2 2140.9,4333.69 ; v1(2240.9,3383.35) 2265.9,3358.35 v1(2305.9,3358.35) ; R10.1 2400.9,3777.72 2400.9,3473.35 ; v1(2310.9,4478.35) 2310.9,4488.98 C1.2 2385.9,4503.98 2385.9,4333.35 2390.33,4337.78 U2.2 2510.99,4323.35 2555.9,4323.35 2645.9,4413.35 v1(2645.9,4463.35) ; 2350.9,3867.72 2400.9,3817.72 2400.9,3473.35 ; v1(2375.9,3418.35) 2340.9,3453.35 C7.2 ; v1(3855.9,3988.35) v1(3855.9,4093.35) ; U4.6 U4.7 4045.9,3914.05 v1(4045.9,3958.35) 4085.9,3958.35 v1(4110.9,3933.35) ; v1(4325.9,4208.35) 4363.85,4208.35 C6.2 ; U1.4 2140.9,4333.69 ; U1.4 2140.9,4333.69 ; C7.2 C7.2@2356.53,3473.35 ; C7.2 C7.2@2356.53,3473.35 ; C7.2@2356.53,3473.35 2400.9,3473.35 ; C7.2@2356.53,3473.35 2400.9,3473.35
  Bottom Layer w10: v1(1825.9,2303.35) 1825.9,2228.35 v1(1845.9,2208.35) ; v1(2015.9,3143.35) 2240.9,3368.35 v1(2240.9,3383.35) ; v1(2180.9,4498.35) 2290.9,4498.35 v1(2310.9,4478.35) ; v1(2305.9,3358.35) 2365.9,3418.35 v1(2375.9,3418.35) ; v1(2645.9,4463.35) 3635.9,4463.35 3855.9,4243.35 v1(3855.9,4093.35) ; v1(3855.9,3988.35) 4015.9,3988.35 v1(4045.9,3958.35) ; v1(4110.9,3933.35) 4130.9,3953.35 4130.9,4068.35 4150.9,4088.35 4315.9,4088.35 4325.9,4098.35 v1(4325.9,4208.35)
pads on no net: USB1.

## Keep-outs
Keep-Out Layer:
  lines w10: 1505,1785.91 ccw(c1785.9,1785.91) 1785.9,1505 ; 1505,4452.44 cw(c1785.9,4452.44) 1785.9,4733.34 ; 4452.44,1505 ccw(c4452.44,1785.91) 4733.34,1785.91 ; 4452.44,4733.34 cw(c4452.44,4452.44) 4733.34,4452.44

## Silkscreen, mask and mechanical layers (free items; w line width, h text height)
Top Overlay:
  text "GND" at 1660.58,4533.35 h39.37 r90
  text "GND" at 1760.58,4533.35 h39.37 r90
  text "GND" at 1855.58,4533.35 h39.37 r90
  text "IO5" at 4475.9,4408.66 h39.37
  text "IO23" at 4440.9,4303.66 h39.37
  text "IO19" at 4455.9,4208.66 h39.37
  text "IO17" at 4455.9,4103.66 h39.37
  text "GND" at 1655.58,4063.35 h39.37 r90
  text "GND" at 1760.58,4063.35 h39.37 r90
  text "GND" at 1865.58,4063.35 h39.37 r90
  text "IO16" at 4455.9,3998.66 h39.37
  text "VCC" at 1640.58,3713.35 h39.37 r90
  text "GND" at 1740.58,3713.35 h39.37 r90
  text "TRIG" at 1840.58,3703.35 h39.37 r90
  text "ECHO" at 1945.58,3693.35 h39.37 r90
  text "GND" at 1745.58,3443.35 h39.37 r90
  text "VCC" at 1640.58,3438.35 h39.37 r90
  text "TRIG" at 1840.58,3433.35 h39.37 r90
  text "ECHO" at 1945.58,3413.35 h39.37 r90
  text "3.3V" at 1920.58,2053.35 h39.37 r90
  text "5V" at 3525.58,1963.35 h39.37 r90
  text "SCL" at 3830.58,1948.35 h39.37 r90
  text "SDA" at 3730.58,1938.35 h39.37 r90
  text "GND" at 3625.58,1933.35 h39.37 r90
  text "B+" at 4455.58,1928.35 h39.37 r90
  text "B-" at 4584.15,1915.97 h39.37 r68
  text "GND" at 1915.58,1878.35 h39.37 r90
  text "SIG" at 3160.58,1798.35 h39.37 r90
  text "GND" at 2935.58,1773.35 h39.37 r90
  text "VCC" at 3045.58,1768.35 h39.37 r90
  text "5V" at 1920.58,1723.35 h39.37 r90
  text "5V" at 3630.58,1708.35 h39.37 r90
  text "SCL" at 3850.58,1688.35 h39.37 r90
  text "GND" at 3525.58,1678.35 h39.37 r90
  text "SDA" at 3735.58,1678.35 h39.37 r90
  text "BY M.NIHAL" at 4255.9,1543.66 h39.37
  text "ESP 32 DEV BOARD" at 2840.9,1518.66 h39.37